# Altium PCB backplane_1_8.PcbDoc (part 1 of 2)
Units mil, origin at the board's own origin, x right, y up, seen from the top; angles counter-clockwise.
Board outline 6255.13 x 4000 mil, 2 copper layers (Top Layer, Bottom Layer); 85 components, 90 nets, 445 pads, 117 vias.
Unrouted connection lines stored in the file: 6.
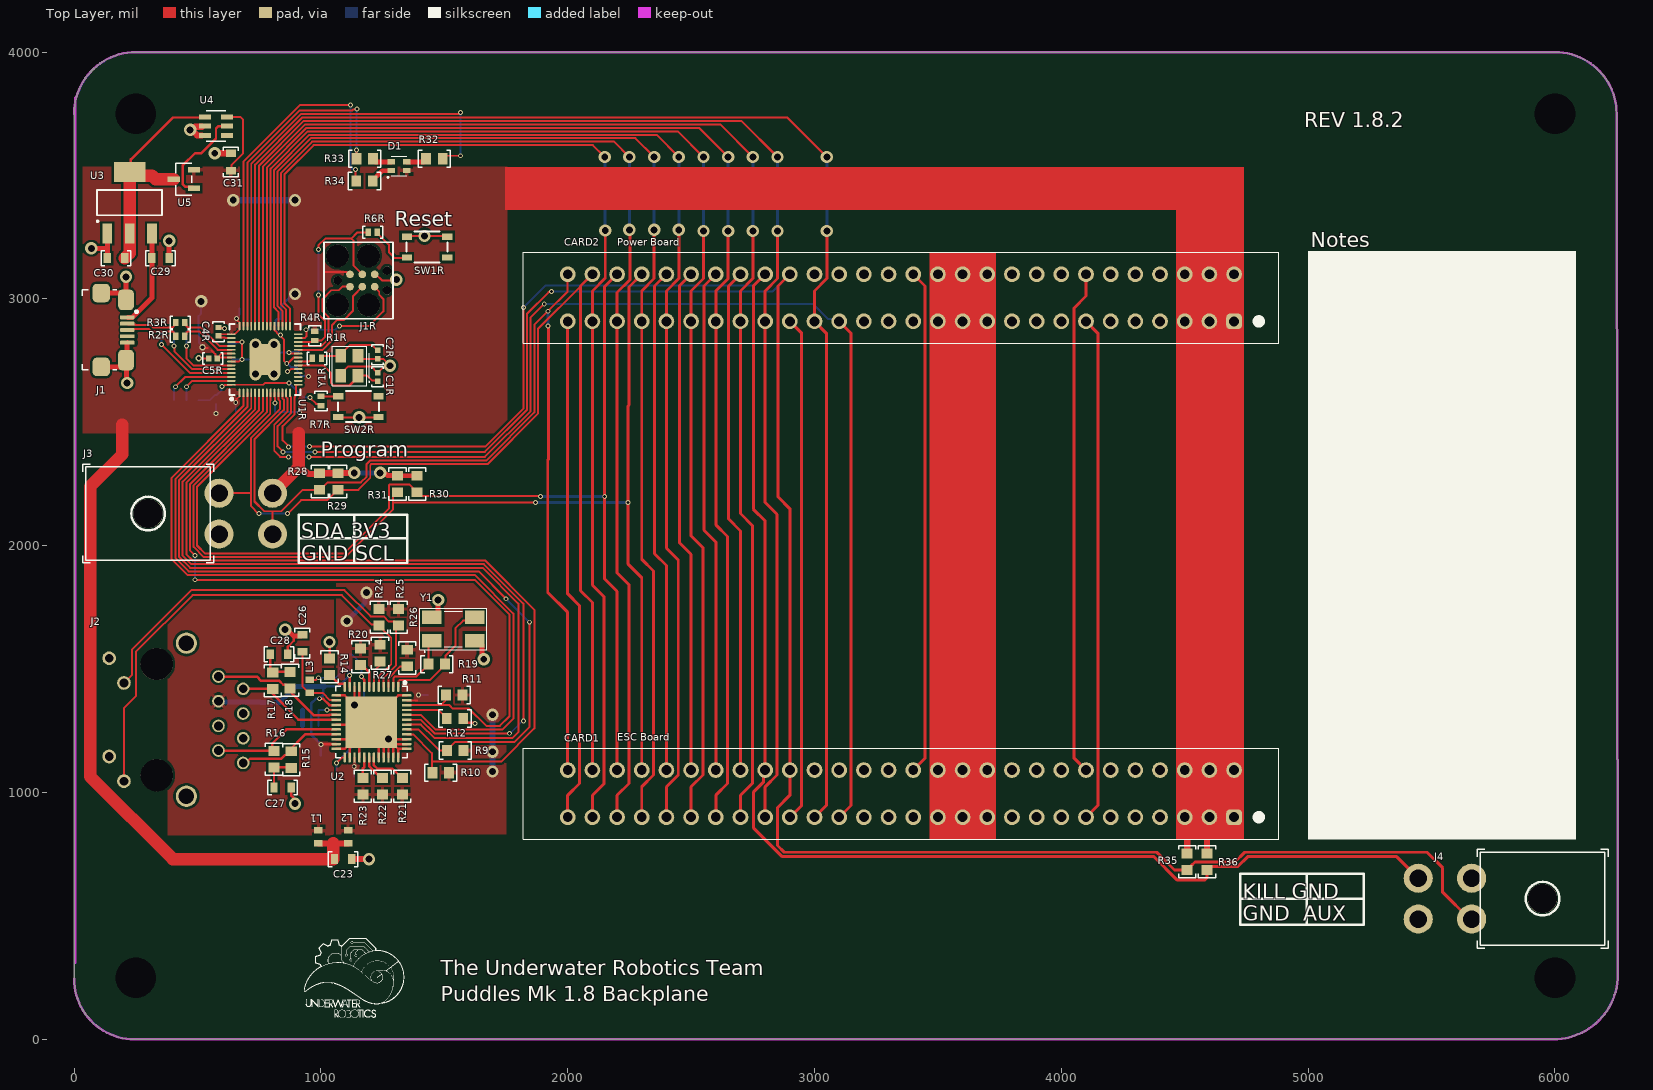
[diagram p0: Top Layer view]
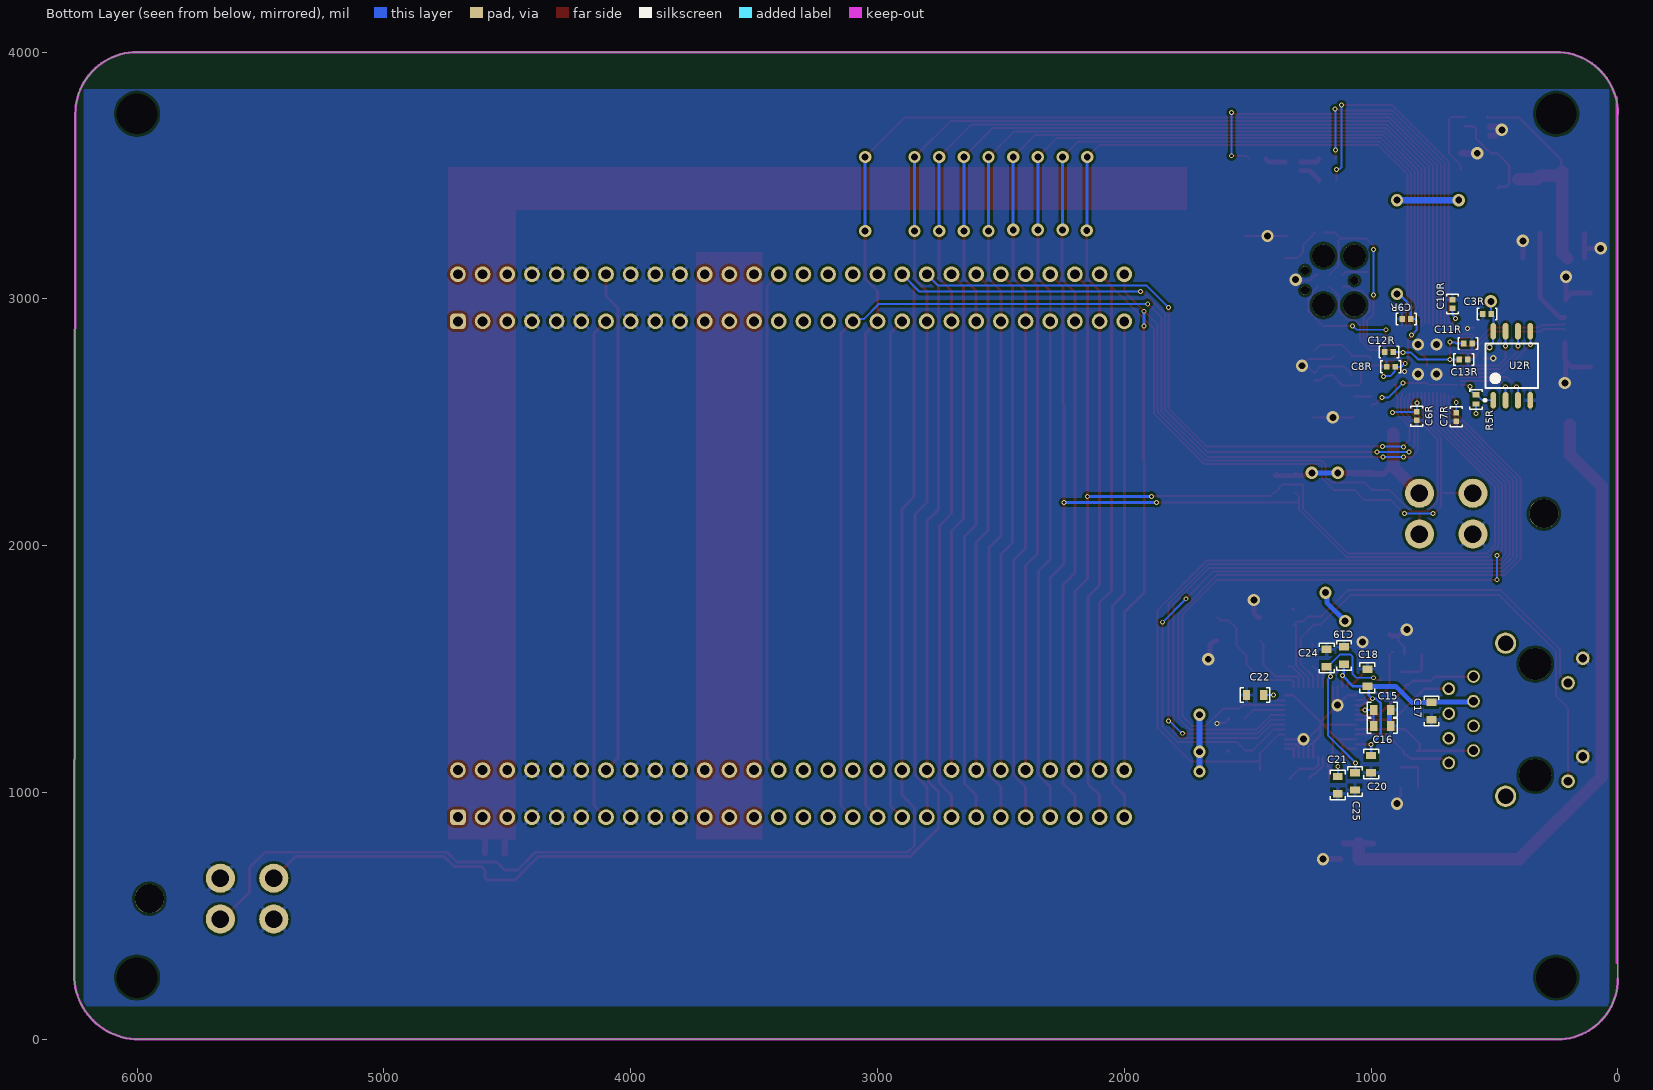
[diagram p1: Bottom Layer view, seen from below]
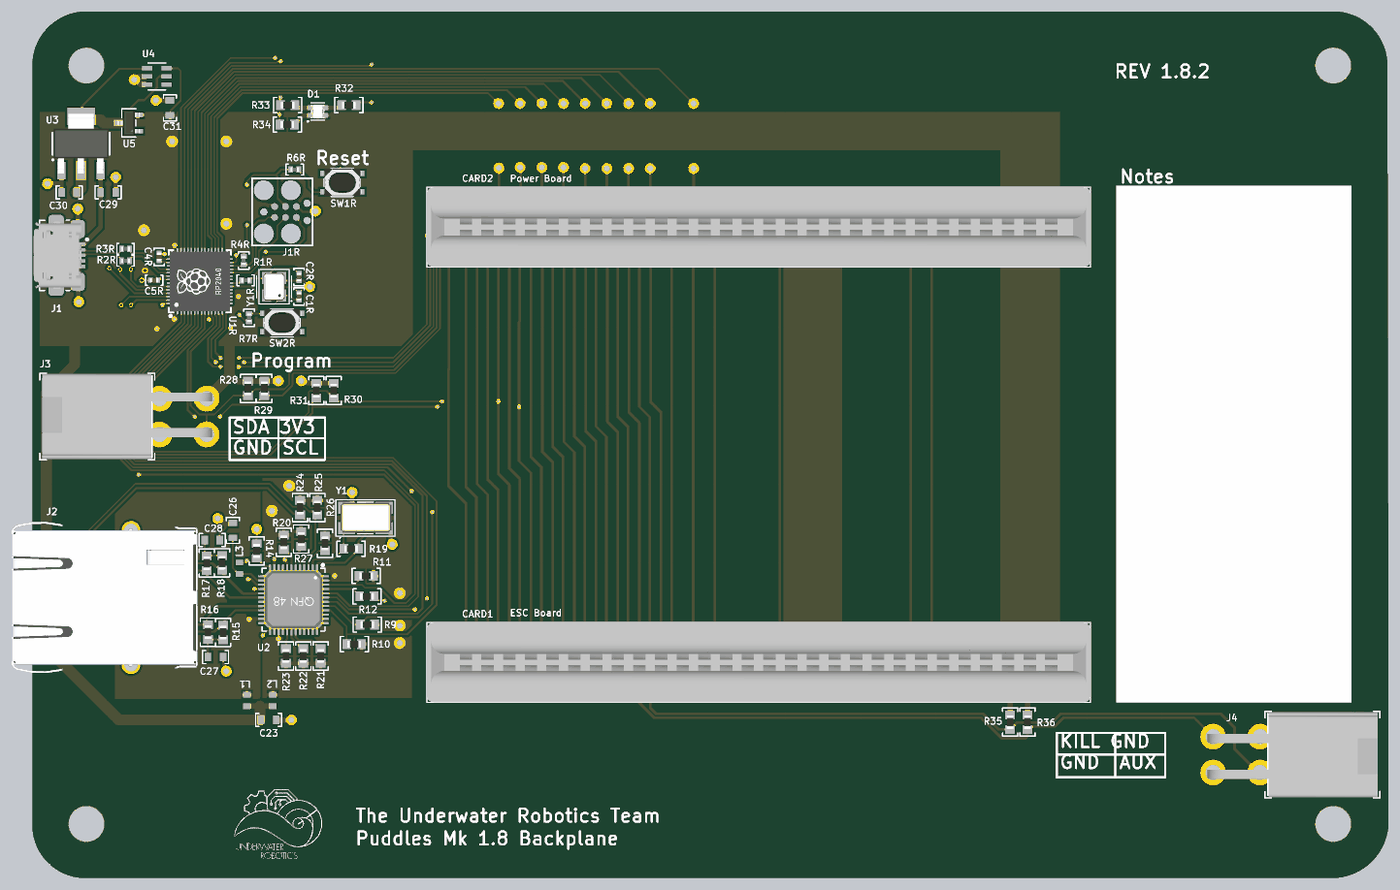
[diagram p3: 3D render of the assembled board from above, using the file's embedded part models]
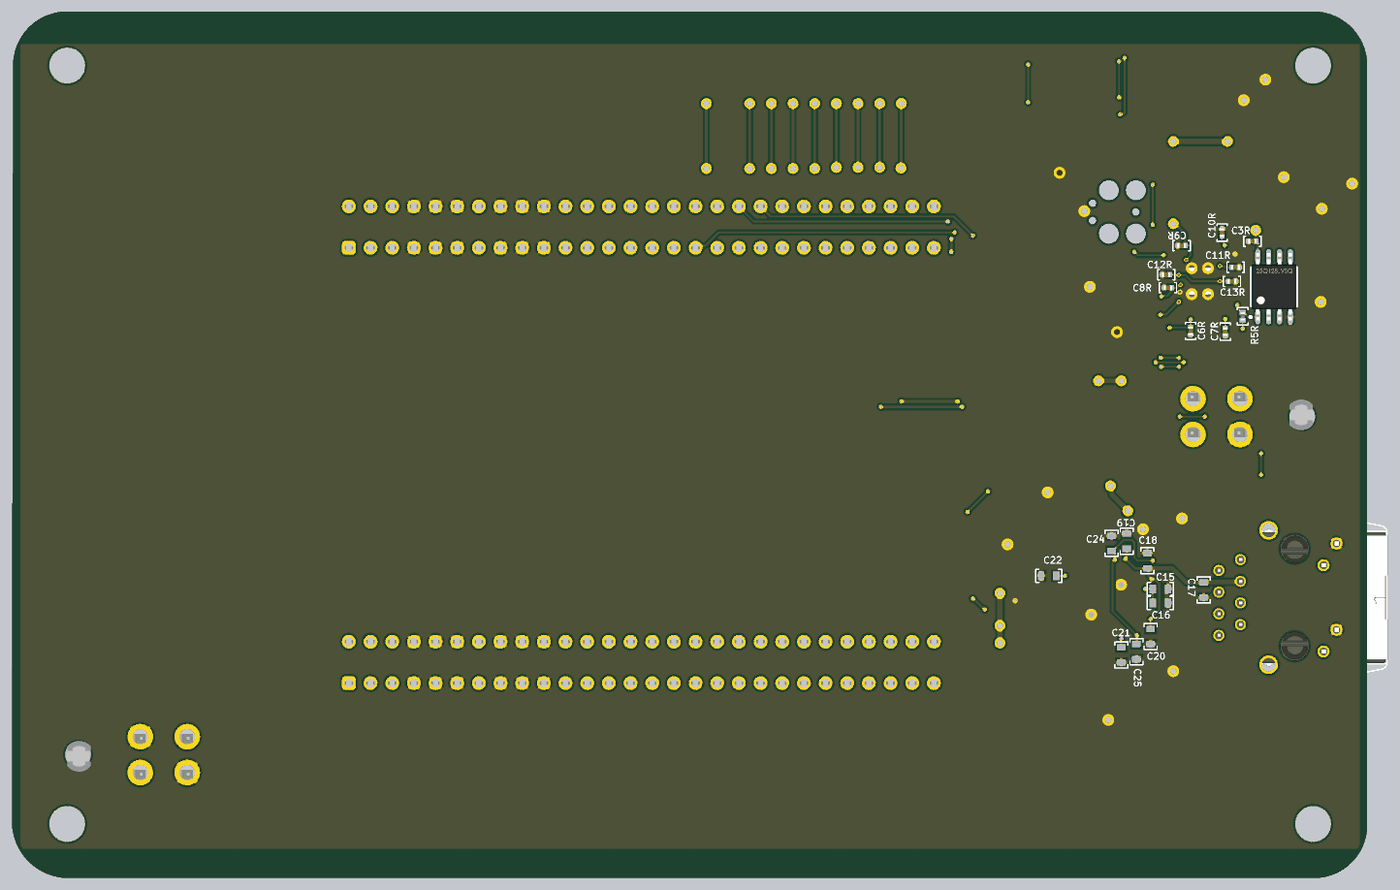
[diagram p4: 3D render of the assembled board from below, using the file's embedded part models]

## Layer stack, top to bottom
Top Solder: solder mask 0.4, Solder Resist, Dk 3.5
Top Layer: signal copper 1.4
Dielectric 1: dielectric 12.6, FR-4, Dk 4.8
Bottom Layer: signal copper 1.4
Bottom Solder: solder mask 0.4, Solder Resist, Dk 3.5

## Board outline
245,0 cw(c245,245) 0,245 0,3750 cw(c250,3750) 250,4000 255,4000 6000,4000 cw(c6000,3750) 6250,3750 6255.13,261.83 cw(c5993.3,261.83) 5993.3,0

## Design rules (kind name [scope] priority, off if disabled: settings)
Clearance [All] p1: gap=10 ignorepadtopadclearanceinfootprint=FALSE except(0: Arc-Hole Track-Hole SMDPad-Hole THPad-Hole Via-Hole Fill-Hole Poly-Hole Region-Hole Text-Hole; 6: Arc-Arc Arc-Track Arc-SMDPad Arc-Via Track-Track Track-SMDPad Track-Via SMDPad-SMDPad SMDPad-Via)
DiffPairsRouting [All] p1: maxlimit=10 minlimit=6 mostfreqgap=8 toplayer_minwidth=8 toplayer_maxwidth=15 toplayer_prefwidth=8 bottomlayer_minwidth=8 bottomlayer_maxwidth=15 bottomlayer_prefwidth=8 maxuncoupledlength=500
HoleSize [All] p1: absolutevalues=TRUE maxlimit=200 minlimit=12 maxpercent=80.000 minpercent=20.000
MinimumSolderMaskSliver [All] p1: minsoldermaskwidth=3
PlaneConnect [All] p1: pad.planeconnectstyle=Relief pad.reliefexpansion=20 pad.reliefentries=4 pad.reliefconductorwidth=10 pad.reliefairgap=10 via.planeconnectstyle=Direct via.reliefexpansion=20 via.reliefentries=4 via.reliefconductorwidth=10 via.reliefairgap=10
PolygonConnect [All] p1: thpad.connectstyle=Relief thpad.reliefconductorwidth=15 thpad.reliefentries=4 thpad.polygonreliefangle="45 Angle" thpad.airgapwidth=10 smdpad.connectstyle=Relief smdpad.reliefconductorwidth=15 smdpad.reliefentries=4 smdpad.polygonreliefangle="90 Angle" smdpad.airgapwidth=10 via.connectstyle=Direct via.reliefconductorwidth=10 via.reliefentries=4 via.polygonreliefangle="90 Angle" via.airgapwidth=10
RoutingVias [All] p1: holewidth=28 width=50 viastyle="Through Hole" minholewidth=28 minwidth=50 maxholewidth=28 maxwidth=50
SilkToSilkClearance [All] p1: silktosilkclearance=3
SilkToSolderMaskClearance [IsPad] p1: minsilkscreentomaskgap=6 clearancetoexposedcopper=TRUE
SolderMaskExpansion [All] p1: expansion=2 istentingtop=FALSE
Width [All] p1: maxlimit=50 minlimit=6 preferedwidth=10
24 further rules are at their usual default settings.

## Classes and differential pairs
component class Ethernet: C15 C16 C17 C18 C19 C20 C21 C22 C23 C24 C25 C26 C27 C28 J2 L1 L2 L3 R9 R10 R11 R12 R14 R15 R16 R17 R18 R19 R20 R21 R22 R23 R24 R25 R26 R27 U2 Y1
component class backplane_main: C29 C30 C31 CARD1 CARD2 D1 J1 J3 J4 R28 R29 R30 R31 R32 R33 R34 R35 R36 U3 U4 U5
differential pair class "USB 2.0": USB USB_RP2040
component class U_RP2040: C1R C2R C4R C6R C8R C10R C12R J1R R1R R2R R3R R4R R5R R6R R7R SW1R SW2R U1R U2R Y1R
differential pair USB: +USB_P -USB_N
differential pair USB_RP2040: +USB_RP2040_P -USB_RP2040_N

## Components (designator, comment, footprint, x,y, rotation, side; value= is the part's Value field where it differs from the comment)
C1R "27pF Ceramic 50V" CAPACITOR_0402 1230,2684.11 r90 top value=27pF
C2R "27pF Ceramic 50V" CAPACITOR_0402 1230,2774.11 r270 top value=27pF
C3R "100nF Ceramic 6.3V" CAPACITOR_0402 530,2939.11 r0 bottom value=0.1uF
C4R "1uF Ceramic 16V" CAPACITOR_0402 585,2866.98 r90 top value=1uF
C5R "100nF Ceramic 6.3V" CAPACITOR_0402 562.13,2759.11 r180 top value=0.1uF
C6R "100nF Ceramic 6.3V" CAPACITOR_0402 815,2525 r270 bottom value=0.1uF
C7R "100nF Ceramic 6.3V" CAPACITOR_0402 655,2522.13 r270 bottom value=0.1uF
C8R "100nF Ceramic 6.3V" CAPACITOR_0402 920,2725 r0 bottom value=0.1uF
C9R "100nF Ceramic 6.3V" CAPACITOR_0402 857.13,2919.11 r0 bottom value=0.1uF
C10R "100nF Ceramic 6.3V" CAPACITOR_0402 670,2979.11 r90 bottom value=0.1uF
C11R "1uF Ceramic 16V" CAPACITOR_0402 607.87,2819.11 r180 bottom value=1uF
C12R "100nF Ceramic 6.3V" CAPACITOR_0402 927.87,2785 r0 bottom value=0.1uF
C13R "100nF Ceramic 6.3V" CAPACITOR_0402 625,2754.11 r180 bottom value=0.1uF
C15 "100nF Ceramic 6.3V" CAPACITOR_0603 955,1335 r180 bottom value=0.1uF
C16 "10uF Ceramic 6.3V" CAPACITOR_0603 955,1270 r180 bottom
C17 "1uF Ceramic 16V" CAPACITOR_0603 755,1330 r270 bottom value=1uF
C18 "100nF Ceramic 6.3V" CAPACITOR_0603 1015,1465 r90 bottom value=0.1uF
C19 "1uF Ceramic 16V" CAPACITOR_0603 1110,1555 r90 bottom value=1uF
C20 "100nF Ceramic 6.3V" CAPACITOR_0603 1000,1115 r270 bottom value=0.1uF
C21 "100nF Ceramic 6.3V" CAPACITOR_0603 1135,1030 r270 bottom value=0.1uF
C22 "1uF Ceramic 16V" CAPACITOR_0603 1470,1395 r0 bottom value=1uF
C23 "10uF Ceramic 6.3V" CAPACITOR_0603 1090,730 r0 top
C24 "100nF Ceramic 6.3V" CAPACITOR_0603 1180,1545 r90 bottom value=0.1uF
C25 "1uF Ceramic 16V" CAPACITOR_0603 1065,1045 r270 bottom value=1uF
C26 "10uF Ceramic 6.3V" CAPACITOR_0603 925,1605 r90 top
C27 "100nF Ceramic 6.3V" CAPACITOR_0603 845,1020 r0 top value=0.1uF
C28 "100nF Ceramic 6.3V" CAPACITOR_0603 830,1560 r0 top value=0.1uF
C29 "10uF Ceramic 6.3V" CAPACITOR_0603 350,3165 r0 top
C30 "100uF Ceramic 6.3V" CAPACITOR_0603 170,3165 r180 top
C31 "10uF Ceramic 6.3V" CAPACITOR_0603 635,3555 r90 top
CARD1 "BACKPLANE_EDGE_SOCKET" SOCKET_BACKPLANE_EDGE_CONN 4700,900 r180 top
CARD2 "BACKPLANE_EDGE_SOCKET" SOCKET_BACKPLANE_EDGE_CONN 4700,2909 r180 top
D1 "EAST1616RGBB4" LED_0606_4SMD 1316.5,3537.72 r0 top
J1 "USB_MICRO R/A" CONN_MINIUSB 110,2874.11 r270 top
J1R "TagConnect SWD" TC2030-MCP 1067.87,3074.5 r0 top
J2 "Ethernet Connector" WIZNET_RB1-125BAG1A 335.04,1294.97 r270 top
J3 "Mini-Fit Jr R/A" "CONN_MOLEX_MINIFIT JR_4 POS_R/A" 300,2130 r270 top
J4 "Mini-Fit Jr R/A" "CONN_MOLEX_MINIFIT JR_4 POS_R/A" 5950,570 r90 top
L1 "HH-1M1608-121JT" CTC-1608_L 990,820 r270 top
L2 "HH-1M1608-121JT" CTC-1608_L 1110,820 r270 top
L3 "HH-1M1608-121JT" CTC-1608_L 955,1430 r270 top
R1R "1k Ohm 1% 1/16W" RESISTOR_0402 983.7,2759.11 r0 top
R2R "27 Ohm 1% 1/16W" RESISTOR_0402 430,2849.11 r0 top
R3R "27 Ohm 1% 1/16W" RESISTOR_0402 430,2904.11 r0 top
R4R "10k Ohm 1% 1/16W" RESISTOR_0402 975,2850.41 r270 top
R5R "10k Ohm 1% 1/16W" RESISTOR_0402 575,2592.81 r90 bottom
R6R "1k Ohm 1% 1/16W" RESISTOR_0402 1210,3270 r180 top
R7R "1k Ohm 1% 1/16W" RESISTOR_0402 1000,2586.3 r270 top
R9 "10k Ohm 5% 1/10W" RESISTOR_0603 1545,1170 r180 top
R10 "10k Ohm 5% 1/10W" RESISTOR_0603 1485,1080 r180 top
R11 "10k Ohm 5% 1/10W" RESISTOR_0603 1540,1395 r180 top
R12 "10k Ohm 5% 1/10W" RESISTOR_0603 1543.5,1300 r0 top
R14 "K / 1%" RESISTOR_0603 1035,1510 r90 top
R15 "2.1k Ohm 5% 1/8W" RESISTOR_0603 880,1133.5 r270 top
R16 "2.1k Ohm 5% 1/8W" RESISTOR_0603 810,1135 r270 top
R17 "2.1k Ohm 5% 1/8W" RESISTOR_0603 805,1453.5 r90 top
R18 "2.1k Ohm 5% 1/8W" RESISTOR_0603 875,1455 r90 top
R19 "1M" RESISTOR_0603 1470,1520 r180 top
R20 "10k Ohm 5% 1/10W" RESISTOR_0603 1160,1550 r270 top
R21 "10k Ohm 5% 1/10W" RESISTOR_0603 1330,1025 r90 top
R22 "10k Ohm 5% 1/10W" RESISTOR_0603 1250,1025 r90 top
R23 "10k Ohm 5% 1/10W" RESISTOR_0603 1170,1025 r90 top
R24 "10k Ohm 5% 1/10W" RESISTOR_0603 1235,1710 r270 top
R25 "10k Ohm 5% 1/10W" RESISTOR_0603 1315,1710 r270 top
R26 "10k Ohm 5% 1/10W" RESISTOR_0603 1350,1545 r270 top
R27 "10k Ohm 5% 1/10W" RESISTOR_0603 1240,1565 r270 top
R28 "10k Ohm 5% 1/10W" RESISTOR_0603 995,2260 r270 top
R29 "10k Ohm 5% 1/10W" RESISTOR_0603 1070,2260 r270 top
R30 "10k Ohm 5% 1/10W" RESISTOR_0603 1390,2250 r270 top
R31 "10k Ohm 5% 1/10W" RESISTOR_0603 1310,2250 r270 top
R32 "10k Ohm 5% 1/10W" RESISTOR_0603 1460,3567.72 r0 top
R33 "10k Ohm 5% 1/10W" RESISTOR_0603 1178,3567.72 r180 top
R34 "10k Ohm 5% 1/10W" RESISTOR_0603 1176.5,3477.72 r180 top
R35 "10k Ohm 5% 1/10W" RESISTOR_0603 4510,720 r270 top
R36 "10k Ohm 5% 1/10W" RESISTOR_0603 4590,720 r270 top
SW1R "434123025826" SMD_434123025826 1430,3210 r180 top
SW2R "434123025826" SMD_434123025826 1152.09,2563.56 r0 top
U1R "RP2040" "QFN-56 RP2040" 772.87,2754.5 r90 top
U2 "W5200" QFN-48 1205,1285 r0 top
U2R "W25Q128JVSIQ" "SOIC-8 W25QxJV" 430,2729.11 r90 bottom
U3 "LM1117IMPX-3.3/NOPB" SOT-223-4 225,3390 r90 top
U4 "LTC4412ES6TRPBF" TSOT-23_S6 575,3700 r0 top
U5 "MOSFET P-CHANNEL 20V 4.7A SOT23" SOT-23-3 445,3485 r90 top
Y1 "CRYSTAL 25.0000MHZ 18PF SMD" "4-SMD No Lead Crystal" 1450,1615 r0 top
Y1R "CRYSTAL 12.0000MHZ 18PF SMD" "4-SMD, NO LEAD CRYSTAL 3.2x2.5mm" 1150,2689.11 r90 top

## Footprints (in the part's own frame and the unit in brackets; to place one, negate y for a bottom-side part, rotate by r counter-clockwise, add the part's x,y. Pads: shape width x height; smd on the part's side, far side on the other; paste and mask are expansions set on the pad)
"4-SMD No Lead Crystal" [mm] "6x3.5mm"
  rect 2x1.4 smd: 1(0,0) 2(4.4,0) 3(4.4,2.4) 4(0,2.4)
  silkscreen extent -1.25,-1.2 5.65,3.35, body extent -0.74,-0.51 5.26,2.99, height 1.11
"4-SMD, NO LEAD CRYSTAL 3.2x2.5mm" [mm]
  rrect0% 1.4x1.1 smd: 1(0,0) 2(2.032,0) 3(2.032,1.778) 4(0,1.778)
  silkscreen extent -1.02,-1.2 3.05,2.92, body extent -0.58,-0.36 2.62,2.14, height 0.82
CAPACITOR_0402 [mm]
  rect 0.56x0.6 smd: 1(-0.435,0) 2(0.435,0)
  silkscreen extent -1.02,-0.6 1.02,0.6, body extent -0.5,-0.28 0.5,0.27, height 0.51
CAPACITOR_0603 [mil] "CAPACITOR 0603"
  rect 30x40 smd: 1(-35,0) 2(35,0)
  silkscreen extent -60,-30 60,30, body extent -31,-16 31,16, height 31
CONN_MINIUSB [mm] "USB2.0 Micro-B Receptacle SMD R/A"
  rrect50% 0.4x1.5 smd: 1(-1.3,2.675) 2(-0.65,2.675) 3(0,2.675) 4(0.65,2.675) 5(1.3,2.675)
  rrect50% 2.1x1.6 smd: 6(-3.1,2.55) 7(3.1,2.55)
  rrect50% 1.9x1.8 smd: 8(3.8,0) 9(-3.8,0)
  silkscreen extent -4.14,-1.96 4.11,3.75, body extent -3.96,-2.67 3.96,2.99, height 2.72
"CONN_MOLEX_MINIFIT JR_4 POS_R/A" [mm] "Molex Minifit Jr 5569 4 Pos R/A"
  round 3 hole 1.8: 1(2.1,7.3) 2(-2.1,7.3) 3(2.1,12.8) 4(-2.1,12.8)
  round 3 hole 3 unplated mask+0: ""(0,0)
  silkscreen extent -5.08,-6.73 5.08,6.73, body extent -5,-6.48 5,13.46, height 11.4
CTC-1608_L [mm] "Chip, 2-Leads, Body 1.75x0.95mm, IPC High Density"
  rect 0.67x0.88 smd: 1(-0.665,0) 2(0.665,0)
  body extent -0.87,-0.48 0.87,0.48, height 0.95
LED_0606_4SMD [mm]
  rrect0% 0.8x0.55 smd: 1(-0.8,-0.45) 2(-0.8,0.45) 3(0.8,0.45) 4(0.8,-0.45)
  silkscreen extent -1.22,-1.22 0.8,1.02, body extent -0.8,-0.8 0.8,0.8, height 0.35
QFN-48 [mm] "48 pin QFN package, 7x7mm, 0.5mm pitch"
  rrect50% 0.25x1 smd: 1(2.75,3.63) 2(2.25,3.63) 3(1.75,3.63) 4(1.25,3.63) 5(0.75,3.63) 6(0.25,3.63) 7(-0.25,3.63) 8(-0.75,3.63) 9(-1.25,3.63) 10(-1.75,3.63) 11(-2.25,3.63) 12(-2.75,3.63) 25(-2.75,-3.63) 26(-2.25,-3.63) 27(-1.75,-3.63) 28(-1.25,-3.63) 29(-0.75,-3.63) 30(-0.25,-3.63) 31(0.25,-3.63) 32(0.75,-3.63) 33(1.25,-3.63) 34(1.75,-3.63) 35(2.25,-3.63) 36(2.75,-3.63)
  rrect50% 1x0.25 smd: 13(-3.63,2.75) 14(-3.63,2.25) 15(-3.63,1.75) 16(-3.63,1.25) 17(-3.63,0.75) 18(-3.63,0.25) 19(-3.63,-0.25) 20(-3.63,-0.75) 21(-3.63,-1.25) 22(-3.63,-1.75) 23(-3.63,-2.25) 24(-3.63,-2.75) 37(3.63,-2.75) 38(3.63,-2.25) 39(3.63,-1.75) 40(3.63,-1.25) 41(3.63,-0.75) 42(3.63,-0.25) 43(3.63,0.25) 44(3.63,0.75) 45(3.63,1.25) 46(3.63,1.75) 47(3.63,2.25) 48(3.63,2.75)
  rect 5.3x5.3 smd: 49(0,0)
  silkscreen extent -3.68,-3.68 3.68,4.19, body extent -3.51,-3.51 3.5,3.5, height 0.84
"QFN-56 RP2040" [mm] "QFN, 56-Leads, Body 7.00x7.00mm, Pitch 0.40mm, Thermal Pad 3.10x3.10mm, IPC Medium Density"
  oval 0.875x0.2 smd: 1(-3.437,2.6) 2(-3.437,2.2) 3(-3.437,1.8) 4(-3.437,1.4) 5(-3.437,1) 6(-3.437,0.6) 7(-3.437,0.2) 8(-3.437,-0.2) 9(-3.437,-0.6) 10(-3.437,-1) 11(-3.437,-1.4) 12(-3.437,-1.8) 13(-3.437,-2.2) 14(-3.437,-2.6) 29(3.437,-2.6) 30(3.437,-2.2) 31(3.437,-1.8) 32(3.437,-1.4) 33(3.437,-1) 34(3.437,-0.6) 35(3.437,-0.2) 36(3.437,0.2) 37(3.437,0.6) 38(3.437,1) 39(3.437,1.4) 40(3.437,1.8) 41(3.437,2.2) 42(3.437,2.6)
  oval 0.2x0.875 smd: 15(-2.6,-3.437) 16(-2.2,-3.437) 17(-1.8,-3.437) 18(-1.4,-3.437) 19(-1,-3.437) 20(-0.6,-3.437) 21(-0.2,-3.437) 22(0.2,-3.437) 23(0.6,-3.437) 24(1,-3.437) 25(1.4,-3.437) 26(1.8,-3.437) 27(2.2,-3.437) 28(2.6,-3.437) 43(2.6,3.437) 44(2.2,3.437) 45(1.8,3.437) 46(1.4,3.437) 47(1,3.437) 48(0.6,3.437) 49(0.2,3.437) 50(-0.2,3.437) 51(-0.6,3.437) 52(-1,3.437) 53(-1.4,3.437) 54(-1.8,3.437) 55(-2.2,3.437) 56(-2.6,3.437)
  rect 3.2x3.2 smd: 57(0,0)
  silkscreen extent -4.19,-3.65 3.65,3.65, body extent -3.52,-3.52 3.52,3.52, height 0.85
RESISTOR_0402 [mm] "Resistor 0402"
  rect 0.55x0.75 smd: 1(-0.475,0) 2(0.475,0)
  silkscreen extent -1.02,-0.64 1.02,0.64, body extent -0.5,-0.25 0.5,0.25, height 0.25
RESISTOR_0603 [mil] "Resistor 0603"
  rect 40x45 smd: 1(-33.5,0) 2(33.5,0)
  silkscreen extent -65,-35 65,35, body extent -31,-16 32,16, height 16
SMD_434123025826 [mm]
  rect 1.05x0.65 smd: A1(-2.075,1.075) A2(2.075,1.075) B1(-2.075,-1.075) B2(2.075,-1.075)
  silkscreen extent -2.1,-1.6 2.1,1.6, body extent -2.3,-1.6 2.3,1.6, height 2.5
SOCKET_BACKPLANE_EDGE_CONN [mm]
  rrect50% 1.62x1.62 hole 1.02: 1(0,0)
  round 1.62 hole 1.02: 2(2.54,0) 3(5.08,0) 4(7.62,0) 5(10.16,0) 6(12.7,0) 7(15.24,0) 8(17.78,0) 9(20.32,0) 10(22.86,0) 11(25.4,0) 12(27.94,0) 13(30.48,0) 14(33.02,0) 15(35.56,0) 16(38.1,0) 17(40.64,0) 18(43.18,0) 19(45.72,0) 20(48.26,0) 21(50.8,0) 22(53.34,0) 23(55.88,0) 24(58.42,0) 25(60.96,0) 26(63.5,0) 27(66.04,0) 28(68.58,0) 29(68.58,-4.851) 30(66.04,-4.851) 31(63.5,-4.851) 32(60.96,-4.851) 33(58.42,-4.851) 34(55.88,-4.851) 35(53.34,-4.851) 36(50.8,-4.851) 37(48.26,-4.851) 38(45.72,-4.851) 39(43.18,-4.851) 40(40.64,-4.851) 41(38.1,-4.851) 42(35.56,-4.851) 43(33.02,-4.851) 44(30.48,-4.851) 45(27.94,-4.851) 46(25.4,-4.851) 47(22.86,-4.851) 48(20.32,-4.851) 49(17.78,-4.851) 50(15.24,-4.851) 51(12.7,-4.851) 52(10.16,-4.851) 53(7.62,-4.851) 54(5.08,-4.851) 55(2.54,-4.851) 56(0,-4.851)
  silkscreen extent -4.57,-7.1 73.15,2.25, body extent -4.57,-7.1 73.15,2.25, height 15.51
"SOIC-8 W25QxJV" [mm] "SOIC, 8-Leads, Body 5.28x5.28mm, Pitch 1.27mm, IPC Medium Density"
  oval 1.7x0.6 smd: 1(-3.55,1.905) 2(-3.55,0.635) 3(-3.55,-0.635) 4(-3.55,-1.905) 5(3.55,-1.905) 6(3.55,-0.635) 7(3.55,0.635) 8(3.55,1.905)
  silkscreen extent -3.67,-2.7 2.3,2.88, body extent -3.95,-2.62 3.95,2.62, height 1.95
SOT-23-3 [mil]
  rect 22x50 smd paste+0 mask+4: 1(-37.5,-41) 2(37.5,-41) 3(0,41)
  silkscreen extent -65,-33 65,33, body extent -60,-52 60,52, height 44
SOT-223-4 [mm]
  rect 2.05x1 smd paste+0 mask+0.102: 1(-3.175,2.3) 2(-3.175,0) 3(-3.175,-2.3)
  rect 2.05x3.25 smd paste+0 mask+0.102: 4(3.175,0)
  silkscreen extent -1.96,-3.35 1.3,3.35, body extent -3.5,-3.25 3.5,3.25, height 1.68
TC2030-MCP [mil]
  round 31 smd: 1(50,-25) 2(50,25) 3(100,-25) 4(100,25) 5(150,-25) 6(150,25)
  round 34 hole 35 unplated: A(0,0) B(200,40) C(200,-40)
  round 92 hole 93 unplated: D(0,-100) E(125,-100) F(0,100) G(125,100)
  silkscreen extent -55,-155 225,155
TSOT-23_S6 [mil]
  rect 48x20 smd: 1(-45,37.4) 2(-45,0) 3(-45,-37.4) 4(45,-37.4) 5(45,0) 6(45,37.4)
  silkscreen extent -40,-62 40,62
WIZNET_RB1-125BAG1A [mm]
  round 1.408 hole 0.9: L1(6.325,-3.38) L2(3.784,-4.899) L3(-3.786,-3.379) L4(-6.325,-4.9)
  round 1.3 hole 0.9: R1(-4.446,6.349) R2(-3.176,8.889) R3(-1.906,6.349) R4(-0.636,8.889) R5(0.634,6.349) R6(1.904,8.889) R7(3.174,6.349) R8(4.444,8.889)
  round 2.184 hole 1.6: S1(-7.876,3.049) S2(7.874,3.049)
  round 3.3 hole 3.3 unplated: ""(-5.716,-0.001) ""(5.714,-0.001)
  body extent -8.87,-10.92 8.87,10.86, height 14.36

## Part data
C1R C2R: library part CAPACITOR_0.000027uF_0402, "Cap 27pF 50V +/-5% / Ceramic 0402", Supplier Part Number 1=445-5589-1-ND, Tolerance="+/- 5%", Voltage=50V, Made By="Robert Pafford", Supplier 1=Digi-Key
C3R C5R C6R C7R C8R C9R C10R C12R C13R: library part CAPACITOR_0.1uF_0402, "Cap 100nF 25V +/-10% / Ceramic 0402", Supplier Part Number 1=478-7868-1-ND, Tolerance="+/- 10%", Voltage=25V, Made By="Robert Pafford", Supplier 1=Digi-Key
C4R C11R: library part CAPACITOR_1uF_0402, "Cap 1uF 16V +/-10% / Ceramic 0402", Supplier Part Number 1=478-0402YD105KAT4ADKR-ND, Tolerance="+/- 10%", Voltage=16V, Made By="Robert Pafford", Supplier 1=Digi-Key
C15 C18 C20 C21 C24 C27 C28: library part CAPACITOR_0.1uF_0603, "Cap 100nF 6.3V +/-10% / Ceramic 0603", Supplier Part Number 1=399-15351-1-ND, Tolerance="+/- 10%", Voltage=6.3V, ComponentLink1Description=Datsheet, ComponentLink1URL=https://www.mouser.com/datasheet/2/212/KEM_C1002_X7R_SMD-1102033.pdf, Made By="Flip B", Supplier 1=Digi-Key
C16 C23 C26 C29 C31: library part CAPACITOR_10uF_0603, "Cap 10uF 6.3V +/-20% / Ceramic 0603", Supplier Part Number 1=1276-1119-1-ND, Tolerance="+/- 20%", Value (uF)="10 uF", Voltage=6.3V, ComponentLink1Description=Digikey, ComponentLink1URL=https://www.digikey.com/en/products/detail/samsung-electro-mechanics/CL10A106MQ8NNNC/3886777, Made By="Flip B", Supplier 1=Digi-Key
C17 C19 C22 C25: library part CAPACITOR_1uF_0603, "Cap 1uF 16V +/-10% / Ceramic 0603", Supplier Part Number 1=399-7847-1-ND, Tolerance="+/- 10%", Voltage=16V, Made By="Flip B", Supplier 1=Digi-Key
C30: library part CAPACITOR_100uF_0603, "Cap 100uF 6.3V +/-20% / Ceramic 0603", Supplier Part Number 1=6911206, Tolerance="+/- 20%", Value (uF)="100 uF", Voltage=6.3V, ComponentLink1Description=Digikey, ComponentLink1URL=https://www.digikey.com/en/products/detail/samsung-electro-mechanics/CL10A106MQ8NNNC/3886777, Made By="Dylan Trainor", Supplier 1=RSComponents
CARD1 CARD2: "Backplane Edge Socket", Supplier Part Number 1=A31719-ND, Made By="Robert Pafford", Supplier 1=Digi-Key
D1: library part LED_RGB_4SMD, "LED RGB CLEAR 4SMD", Blue Forward Current=5mA, Blue Forward Voltage=2.8V, Color=RGB, Package=4-SMD, Red Forward Voltage=1.8V, Supplier Part Number 1=1080-1552-1-ND, ComponentLink1Description=Datasheet, ComponentLink1URL=https://everlightamericas.com/index.php?controller=attachment&id_attachment=3220, Green Forward Current=5mA, Green Forward Voltage=2.8V, Made By="Robert Pafford", Red Forward Current=5mA, Supplier 1=Digi-Key
J1: library part CONN_MICROUSB, "Amphenol Micro USB-B / USB2.0 5 Pin Right Angle SMD", Color=Silver, Current Per Pin=1.8A, Manufacturer=Amphenol, Supplier Part Number 1=609-4613-1-ND, ComponentLink1Description=Datasheet, ComponentLink1URL=https://cdn.amphenol-icc.com/media/wysiwyg/files/documentation/datasheet/inputoutput/io_usb_micro.pdf?__cf_chl_jschl_tk__=05693735e19256298f6ef6ca2bb2e65c376a4f56-1625503833-0-Abitsb0-ufjOXJYs_S3J3r2iTn-nObalbmXUksF1VvO_h_WEmRdMlUD1I8-hmWSEVWzY1pirKnrPZWfgY3851qyBZe5ZvnNQePLGIzUgdEIQBVUyW36RsbYpDLEWxJ4horD-5gChFgobLYqwmG5aHl0E8lIn_twwPPrOxilK2gP0q9t_CNOs_u5fMqXvXUrlsOv8tIE2NRlu6NVP8qtkL2GjhlkeTUbDMF8WvvpPDTFOgvZ4Y16Ej8F8AhWos88mo5B1HssXozw0XrkJQIqERITUu6rqloz9kf4ZzhBHtDAt-IkiAFY_Ds9SW8FYKKTtINJVpHZQ6Gyu1FFM4Dc9MO0maE8_mmNcwlxqyRoRk_MPWW8VyByXWM5RSp52jteRKw7FeI9WIYvCbPAOy0Eyib-aseIQsnGbglBcUY6_2xp8GYaJM38H3dNvBPsSOfJBPndKedwKHllxjkucXn6xsN0sDXkpGN-cu8_2bDTJ0g-uUucKSCooYX-ApSDNGpkA_p9zv1SOAD8c0zaZVmtiBsN75QpVz2rzq9_BFxOywPvR, Configuration="Right Angle", Created by="Flip B", Number of Positions=5, Pitch=0.65mm, Series=10118192, Supplier 1=Digi-Key
J1R: library part TC2030_SWD, "TagConnect TC2030 ARM SWD 6-pin"
J2: library part RB1-125BAG1A, "CONN JACK 1PORT 100 BASE-T PCB"
J3 J4: library part "CONN_MOLEX_MINIFIT JR_4POS_R/A", "Molex Minifit Jr. 5569  / 4 Pos R/A Natural", Color=Natural, Current Per Pin=13A, Manufacturer=Molex, Supplier Part Number 1=WM13112-ND, ComponentLink1Description=Datasheet, ComponentLink1URL=https://www.molex.com/pdm_docs/sd/026013115_sd.pdf, Configuration="Right Angle", Created by="Flip B", Number of Positions=4, Pitch=4.2mm, Series="Minifit Jr 5569", Supplier 1=Digi-Key
L1 L2 L3: library part CMP-2000-06403-1, "Chip Ferrite Bead, 0.14 Ohm, 1.1 A, -55 to 125 degC, 2-Pin SMD, RoHS, Tape and Reel", DC Current Max=1.1A, DC Resistance Max=140MOhm, Manufacturer="CTC Coils", Package Description="2-Pin Surface Mount Device, Body 1.6 x 0.8 mm", Package Reference=1608, PartNumber=HH-1M1608, Temperature Max=125degC, Temperature Min=-55degC, Datasheet URL=http://data.icbank.com/ICBShop/board/beadhbm.pdf, Datasheet Version=07/2004, Manufacturer URL=http://www.brokerforum.com/components-parts/CTCCoils-e-en.jsa, Mounting Technology=SurfaceMount, Packing=TapeandReel
R1R R6R R7R: library part RESISTOR_1K_0402, "RES 1k OHM 1% 1/16W 0402", Digikey Part Numer=CR0603-JW-104ELFTR-ND, Supplier Part Number 1=13-AC0402FR-131KLCT-ND, Tolerance="+/- 1%", Value  (Ohms)=1K, Made By="Robert Pafford", Supplier=Digikey, Supplier 1=Digi-Key, Wattage=1/16W
R2R R3R: library part RESISTOR_27_0402, "RES 27 OHM 1% 1/16W 0402", Digikey Part Numer=CR0603-JW-104ELFTR-ND, Supplier Part Number 1=YAG5278DKR-ND, Tolerance="+/- 1%", Value  (Ohms)=27, Made By="Robert Pafford", Supplier=Digikey, Supplier 1=Digi-Key, Wattage=1/16W
R4R R5R: library part RESISTOR_10K_0402, "RES 10k OHM 1% 1/16W 0402", Digikey Part Numer=CR0603-JW-104ELFTR-ND, Supplier Part Number 1=YAG3436CT-ND, Tolerance="+/- 1%", Value  (Ohms)=10K, Made By="Robert Pafford", Supplier=Digikey, Supplier 1=Digi-Key, Wattage=1/16W
R9 R10 R11 R12 R20 R21 R22 R23 R24 R25 R26 R27 R28 R29 R30 R31 R32 R33 R34 R35 R36: library part RESISTOR_10K_0603, "RES 10k OHM 5% 1/10W 0603", Digikey Part Numer=CR0603-JW-104ELFTR-ND, Supplier Part Number 1=2019-RK73B1JTTD103JCT-ND, Tolerance="+/- 5%", Value  (Ohms)=10K, ComponentLink1Description=Datasheet, ComponentLink1URL=https://www.bourns.com/docs/product-datasheets/CRxxxxx.pdf, Made By="Robert Pafford", Supplier=Digikey, Supplier 1=Digi-Key, Wattage=1/8W
R14: library part "RESISTOR_28.7K / 1%_0603_1", "RES 28.7K OHM 1% 1/8W 0603", Digikey Part Numer=CR0603-JW-104ELFTR-ND, Supplier Part Number 1=541-28.7KHCT-ND, Tolerance="+/- 5%", Value  (Ohms)="28.7K / 1%", ComponentLink1Description=Datasheet, ComponentLink1URL=https://www.bourns.com/docs/product-datasheets/CRxxxxx.pdf, Made By="Robert Pafford", Supplier=Digikey, Supplier 1=Digi-Key, Wattage=1/8W
R15 R16 R17 R18: library part RESISTOR_2.1K_0603_1, "RES 2.1k OHM 5% 1/8W 0603", Digikey Part Numer=CR0603-JW-104ELFTR-ND, Supplier Part Number 1=YAG1852CT-ND, Tolerance="+/- 5%", Value  (Ohms)=2.1K, ComponentLink1Description=Datasheet, ComponentLink1URL=https://www.bourns.com/docs/product-datasheets/CRxxxxx.pdf, Made By="Robert Pafford", Supplier=Digikey, Supplier 1=Digi-Key, Wattage=1/8W
R19: library part RESISTOR_1M_0603_1, "RES 1M OHM 1/8W 0603", Digikey Part Numer=CR0603-JW-104ELFTR-ND, Supplier Part Number 1=RMCF0603JT1M00CT-ND, Tolerance="+/- 5%", ComponentLink1Description=Datasheet, ComponentLink1URL=https://www.bourns.com/docs/product-datasheets/CRxxxxx.pdf, Made By="Robert Pafford", Supplier=Digikey, Supplier 1=Digi-Key, Value  (Ohms)=1M, Wattage=1/8W
SW1R SW2R: library part "Tactile Switch SMD", "WS-TASV J-Bend SMT Tact Switch, SPST-NO, 16VDC, 50mA, 260g", Manufacturer="Wurth Elektronik", Operating Temperature Max=85°C, Operating Temperature Min=-40°C, Rated Current=50mA, Rated Voltage=16VDC, Category="Tact Switches", Circuit=SPST-NO, ComponentLink1Description="Website Link", ComponentLink1URL=https://www.we-online.com/redexpert/article/434123025826?ad, ComponentLink2Description="Datasheet Link", ComponentLink2URL=https://www.we-online.com/redexpert/spec/434123025826?ad, Contact Material="Stainless Steel", Contact Plating=Silver, Height=2.5mm, Length=4.2mm, Manufacturer Part Number=434123025826, Match Code=WS-TASV, Mount="Surface Mount", Operation Force=260g, Packaging="Tape and Reel", Terminal Material="Copper Alloy", Terminal Plating=Silver, Washable=No, Width=3.2mm
U1R: "Raspberry Pi RP2040", Crystal Frequency="12 MHz", Input Voltage=3.3V, Available Busses="SPI, I2C, PWM, USB", ComponentLink1Description=DigiKey, ComponentLink2Description=Datasheet, ComponentLink2URL=https://datasheets.raspberrypi.org/rp2040/rp2040-datasheet.pdf, Made By="Robert Pafford", Number of GPIOs=29
U2: "WIZNET W5200 / 48QFN (7x7 mm)", Package="SOT-223-4 Texas Instruments", Supplier Part Number 1=950-W5200, Arrow_Electronics-Purchase-URL=https://snapeda.com/shop?store=Arrow+Electronics&id=410186, Availability=Good, ComponentLink1Description=Datasheet, ComponentLink1URL=https://www.wiznet.io/product-item/w5200/, Created by=Siddharth.V, DigiKey-Purchase-URL=https://snapeda.com/shop?store=DigiKey&id=410186, MF="Texas Instruments", Mouser-Purchase-URL=https://snapeda.com/shop?store=Mouser&id=410186, MP=LM1117IMPX-3.3/NOPB, Price=None, SnapEDA_Link=https://www.snapeda.com/parts/LM1117IMPX-3.3/NOPB/Texas%20Instruments/view-part/410186/?ref=snap, Supplier 1=Mouser, Texas_Instruments-Purchase-URL=https://snapeda.com/shop?store=Texas+Instruments&id=410186
U2R: "IC FLASH 128MBIT SPI/QUAD 8SOIC", Supplier Part Number 1=W25Q128JVSIQ-ND, Made By="Robert Pafford", Size=128M, Supplier 1=Digi-Key
U3: "IC REG LIN 3.3V 800MA SOT223-4", Manufacturer="Texas Instruments", Package=SOT-223-4, PartNumber=LM1117IMP-3.3/NOPB, Supplier Part Number 1=LM1117IMPX-3.3/NOPBCT-ND, Amp Out=800mA, Created by="Dylan T", Supplier 1=Digi-Key, Vin (Max)=15V, Vout (Min/Fixed)=3.3V
U4: "OR Controller Source Selector Switch P-Channel 2:1 TSOT-23-6", Package="SOT-23-6 Analog Devices", Arrow_Europe-Purchase-URL=https://snapeda.com/shop?store=Arrow+Europe&id=4343773, Availability=Good, Check_prices=https://www.snapeda.com/parts/LTC4412ES6%23TRPBF/Analog%20Devices/view-part/4343773/?ref=eda, DigiKey-Purchase-URL=https://snapeda.com/shop?store=DigiKey&id=4343773, MF="Analog Devices", Mouser-Purchase-URL=https://snapeda.com/shop?store=Mouser&id=4343773, MP=LTC4412ES6#TRPBF, Price=None, SnapEDA_Link=https://www.snapeda.com/parts/LTC4412ES6%23TRPBF/Analog%20Devices/view-part/4343773/?ref=snap
U5: library part TSM500P02CX, "P-Channel 20 V 4.7A (Tc) 1.56W (Tc) Surface Mount SOT-23", Amp Rating="4.7 A", Package="TO-236-3, SC-59, SOT-23-3", Power Dissipation="1.56W (Tc)", Supplier Part Number 1=TSM500P02CXRFGCT-ND, Created by="Robert Pafford", FET Type=P-Channel, Manufacturer_Part_Number=TSM500P02CX, Rds (on)="50mOhm @ 3A, 4.5V", Supplier 1=Digi-Key, Vdss="20 V", Vendor="Taiwan Semiconductor Corporation", Vgs (Max)=±10V, Vgs (th)="800mV @ 250µA"
Y1: library part CRYSTAL_25MHz_SMD_1, "25 MHz ±20ppm Crystal 18pF", Frequency="12 MHz", Load Capacitance=18pF, Supplier Part Number 1=2151-AS-25.000-18-F-EXT-ND, ESR="50 Ohmz", Made By="Robert Pafford", Supplier 1=Digi-Key
Y1R: library part CRYSTAL_12MHz_SMD_SMALL, "12 MHz ±20ppm Crystal 18pF 100 Ohms 4-SMD, No Lead (3.2x2.5mm)", Frequency="12 MHz", Load Capacitance=18pF, Supplier Part Number 1=2151-RH100-12.000-18-2030-EXT-TRCT-ND, ESR="100 Ohms", Made By="Robert Pafford", Supplier 1=Digi-Key

## Free pads (board coordinates)
  round 60 hole 165: 1(250,250) 1(250,3750) 1(6000,250) 1(6000,3750)

## Via types
v1: diameter 20, hole 12, Top Layer to Bottom Layer, 64 vias
v2: diameter 50, hole 28, Top Layer to Bottom Layer, 51 vias
v3: diameter 25, hole 15, Top Layer to Bottom Layer, 2 vias

## Nets (pads, with @x,y where several pads share a name; then routed paths per layer and width w, separated by ;. In a path a pad name is that pad's centre, name@x,y a point inside that pad or via, vN(x,y) a via of type N, cw(c..) or ccw(c..) an arc to the next point about the centre after c; other vN are vias at no path point)
1v1_RP2040: C11R.1 C12R.1 C13R.1 U1R.23 U1R.45 U1R.50 | length 538.4
  Top Layer w8: U1R.50@637.54,2746.63 668.38,2746.63 676.75,2755 v1(680,2755) v1(680,2825) 679.7,2825.3 637.6,2825.3 U1R.45@637.54,2825.37 ; v1(870,2783.25) 873.25,2783.25 878.37,2778.12 U1R.23@908.21,2778.12
  Bottom Layer w8: C11R.1@625,2819.11 654,2819.11 658,2823.11 678.11,2823.11 v1(680,2825) ; C13R.1@642.13,2754.11 642.57,2754.55 679.55,2754.55 v1(680,2755) 680.5,2754.5 809.69,2754.5 838.43,2783.25 v1(870,2783.25) 870.88,2784.12 909.87,2784.12 C12R.1@910.75,2785 C12R.1@910.55,2785.2
3V3_RP2040: C3R.1 C4R.1 C5R.1 C6R.1 C7R.1 C8R.1 C9R.1 C10R.1 C23.1 C31.1 CARD1.1 CARD1.2 CARD1.3 CARD1.54 CARD1.55 CARD1.56 CARD2.1 CARD2.2 CARD2.3 CARD2.54 CARD2.55 CARD2.56 D1.4 J1R.2 J3.4 L1.2 L2.2 R4R.1 R5R.1 R28.1 R29.1 R30.1 R31.1 R35.1 R36.1 U1R.1 U1R.10 U1R.22 U1R.33 U1R.42 U1R.43 U1R.44 U1R.48 U1R.49 U2R.8 U4.6 U5.2 | length 5963.3
  Top Layer w8: v3(520,2804.23) 523.25,2800.98 540.11,2800.98 ; 556.41,2791.94 572.34,2776.01 572.34,2766.8 C5R.1@579.25,2759.9 ; U4.6@620,3737.4 672.6,3737.4 685,3725 685,3590 637.31,3542.31 637.31,3522.31 C31.1@635,3520 ; U1R.49@637.54,2762.37 U1R.49@637.54,2762.37 586.28,2762.44 C5R.1@579.25,2759.11 585.92,2765.77 585.92,2767.33 596.71,2778.12 U1R.48@637.54,2778.12 ; U1R.44@637.54,2841.11 612.99,2841.11 610,2844.11 590.75,2844.11 C4R.1@585,2849.86 591.94,2856.8 637.48,2856.8 U1R.43@637.54,2856.86 ; U1R.43@650.76,2856.93 670.51,2876.67 670.51,2903 660.03,2913.48 660.03,2917.7 v1(657.73,2920) ; v1(655,2580) 657.3,2582.3 657.3,2592.79 U1R.1@670.45,2605.94 ; U1R.10@812.24,2619.17 812.31,2619.1 812.31,2603.35 813.66,2602 813.66,2578.61 v1(814.75,2577.52) ; U1R.33@812.24,2889.83 812.31,2889.77 812.31,2872.52 829.58,2855.25 833.52,2855.25 v1(835.82,2852.96) ; v1@834.41,2850 836.03,2850 850,2836.03 850,2750 v1(861.55,2738.45) ; v1@860,2740 862.3,2742.3 868.95,2742.3 888.97,2762.31 908.15,2762.31 U1R.22@908.21,2762.37 ; 1012.87,3109.5 1075.59,3109.5 1101.69,3109.5 1111.69,3099.5 J1R.2@1117.87,3099.5
  Top Layer w20: L1.2@989.41,793.23 L1.2@990,793.82 ; v2(1240,2295) 1245.74,2289.26 1265.74,2289.26 1270,2285 1301.5,2285 1305,2288.5 R31.1@1310,2283.5 R30.1@1390,2283.5 R30.1@1383.5,2290
  Top Layer w25: 910,2330 950,2290 991.5,2290 R28.1@995,2293.5 R29.1@1070,2293.5 1070.75,2294.25 1134.25,2294.25 v2(1135,2295) ; L1.2@990,793.82 1050,793.82 L2.2@1110,793.82 L2.2@1110.59,794.41 ; R35.1@4510,753.5 4510,835 4577.5,835 4590,822.5 R36.1@4590,753.5
  Top Layer w50: 195,2489.53 195,2370 65,2240 65,1065 400,730 1050,730 1050,793.82 ; J3.4@803.94,2212.68 910,2318.74 910,2455
  Bottom Layer w8: v2(515,2990) 513.94,2988.94 513.94,2940.17 C3R.1@512.87,2939.11 512.87,2938.32 505,2930.45 U2R.8@505,2868.87 505.42,2868.45 505.42,2823.41 520,2808.83 v3(520,2804.23) ; v1(575,2535) R5R.1@575,2574.11 ; C7R.1@655,2539.25 v1(655,2580) ; v1(657.73,2920) 657.73,2923.25 670,2935.52 C10R.1@670,2961.98 ; v1(814.75,2577.52) 814.87,2577.4 814.87,2542.25 816.06,2541.06 912.21,2541.06 v1(913.27,2540) ; v1(835.82,2852.96) 816.22,2872.55 816.22,2914.57 820.91,2919.26 839.85,2919.26 C9R.1@840,2919.11 ; v1(861.55,2738.45) 863.99,2738.45 878.33,2724.11 C8R.1@902.87,2724.11 ; C8R.1@902.87,2725 904.12,2723.75 904.12,2705.88 922.7,2687.3 947.7,2687.3 v1(950,2685)
  Bottom Layer w10: C9R.1@840,2919.11 840,2972.93 887.07,3020 v2(895,3020)
  Bottom Layer w20: v2@1139.25,2290 1144.25,2295 v2(1240,2295)
  Bottom Layer w25: v2(645,3400) v2(895,3400)
3V3U: C30.1 U3.2 U3.4 U4.1 U5.3 | length 973.2
  Top Layer w10: U3.4@225,3515 230,3520 230,3565 400,3735 527.6,3735 U4.1@530,3737.4
  Top Layer w50: C30.1@205,3165 225,3185 U3.2@225,3265 U3.4@225,3515 240.35,3499.65 315.35,3499.65 330,3485 U5.3@404,3485
+5: CARD1.11 CARD1.12 CARD1.13 CARD1.44 CARD1.45 CARD1.46 CARD2.11 CARD2.12 CARD2.13 CARD2.44 CARD2.45 CARD2.46
ACC_PWR: CARD1.17 CARD2.17 U1R.13 | length 5102.8
  Top Layer w8: U1R.13@859.55,2605.94 859.55,2601.85 865,2596.4 865,2545 811,2491 811,2384 835,2360 v1(869,2360) ; v1(951,2360) 1664.6,2360 1850,2545.4 1850,2925 v1(1905,2980)
  Top Layer w12: CARD1.17@3100,900 3147.89,947.89 3147.89,2861.11 CARD2.17@3100,2909
  Bottom Layer w8: v1(869,2360) v1(951,2360) ; v1(1905,2980) 2993.9,2980 3056.11,2917.79 3091.21,2917.79 CARD2.17@3100,2909
AUX_SW: CARD1.38 CARD2.38 J4.2 R35.2 U1R.14 | length 8282.2
  Top Layer w8: v1(846.59,2380.05) 846.59,2381.08 825,2402.67 825,2484.81 879,2538.81 879,2602.24 875.24,2606 U1R.14@875.24,2619.17 ; v1(976.3,2380) 1664.8,2380 1835,2550.2 1835,2940 1922.7,3027.7 1932.7,3027.7 v1(1935,3030)
  Top Layer w12: CARD2.38@2900,3100 2852.11,3052.11 2852.11,2197.89 2900,2150 CARD1.38@2900,1091 2900,988.49 2850,938.49 2850,785 2877,758 4387,758 4458.5,686.5 R35.2@4510,686.5 4512.5,686.5 4526.5,700.5 4526.5,703 4542,718.5 4703.5,718.5 4743,758 5482,758 5545,695 5545,595.96 5653.64,487.32 J4.2@5662.6,487.32
  Bottom Layer w8: v1(846.59,2380.05) 846.8,2380.27 976.03,2380.27 v1(976.3,2380) ; v1(1935,3030) 2830,3030 CARD2.38@2900,3100
BRD_SCL: CARD1.31 CARD2.31 R30.2 U1R.9 | length 4651.3
  Top Layer w8: U1R.9@796.5,2619.17 796.5,2589.78 794.75,2588.03 794.75,2535.15 498,2238.4 498,2000.8 530.8,1968 1093.2,1968 1275,2149.8 1275,2244.12 1279.69,2248.81 1357.69,2248.81 1371.5,2235 1371.5,2232.5 1387.5,2216.5 R30.2@1390,2216.5 1392.5,2216.5 1408.5,2200.5 1889.5,2200.5 v1(1890,2200)
  Top Layer w12: CARD1.31@2200,1091 2200,1815 2150,1865 2150,3050 CARD2.31@2200,3100
  Bottom Layer w12: v1(1890,2200) v1(2150,2200)
BRD_SDA: CARD1.32 CARD2.32 R31.2 U1R.8 | length 4735.1
  Top Layer w8: U1R.8@780.75,2619.17 780.75,2540.95 484,2244.2 484,1995 525,1954 1099,1954 1291.5,2146.5 1291.5,2175 ; R31.2@1307.58,2214.08 1305.08,2214.08 1291.5,2200.5 1291.5,2175 ; v1(1870,2175) 1291.5,2175
  Top Layer w12: CARD1.32@2300,1091 2300,1870 2245,1925 2245,2566.58 2247.89,2569.47 2247.89,3047.89 CARD2.32@2300,3100
  Bottom Layer w12: v1(1870,2175) v1(2245,2175)
CPU2_PWR: CARD1.19 CARD2.19 | length 2048.7
  Top Layer w12: CARD1.19@2900,900 2947.89,947.89 2947.89,2861.11 CARD2.19@2900,2909
CPU_PWR: CARD1.18 CARD2.18 U1R.38 | length 5851.6
  Top Layer w8: U1R.38@733.5,2889.83 733.5,3544.31 924.2,3735 2890,3735 v2(3050,3575)
  Top Layer w12: CARD1.18@3000,900 3047.89,947.89 3047.89,2861.11 CARD2.18@3000,2909 3000,3032.27 3050,3082.27 v2(3050,3275)
  Bottom Layer w12: v2(3050,3275) v2(3050,3575)
DBG_TX_RP2040: J1R.5 U1R.27 | length 522.7
  Top Layer w8: U1R.27@908.21,2841.11 934.49,2841.11 941.53,2848.16 941.53,2873.47 v1(940,2875) ; v1(1075,2890) 1193.93,2890 1253.37,2949.44 1253.37,2999.56 1236.37,3016.56 1236.37,3029.11 1217.87,3047.61 J1R.5@1217.87,3049.5
  Bottom Layer w8: v1(940,2875) 1058.89,2875 1073.89,2890 v1(1075,2890)